# Altium PCB keyboard.PcbDoc
Units mm, origin at the board's own origin, x right, y up, seen from the top; angles counter-clockwise.
Board outline 142 x 101 mm, 2 copper layers (Top Layer, Bottom Layer), stack 1.18 mm thick; 94 components, 90 nets, 544 pads, 262 vias.
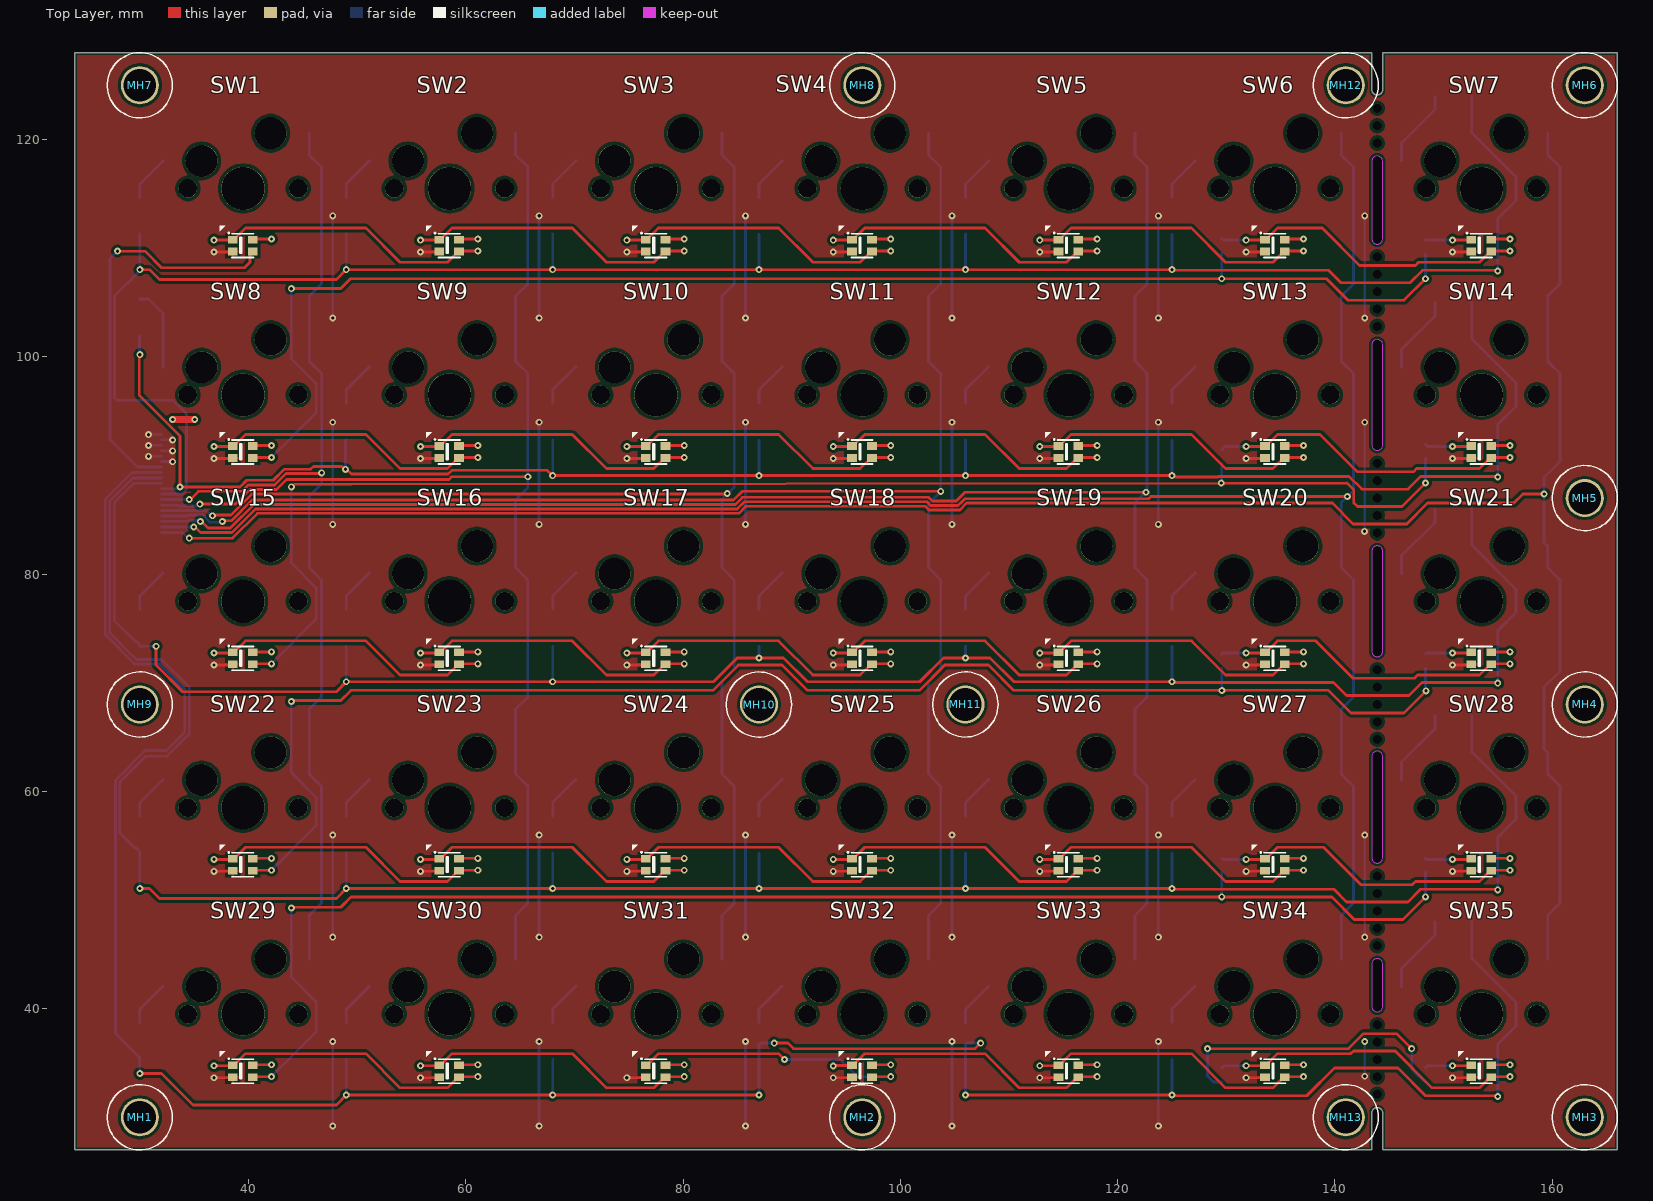
[diagram p0: Top Layer view]
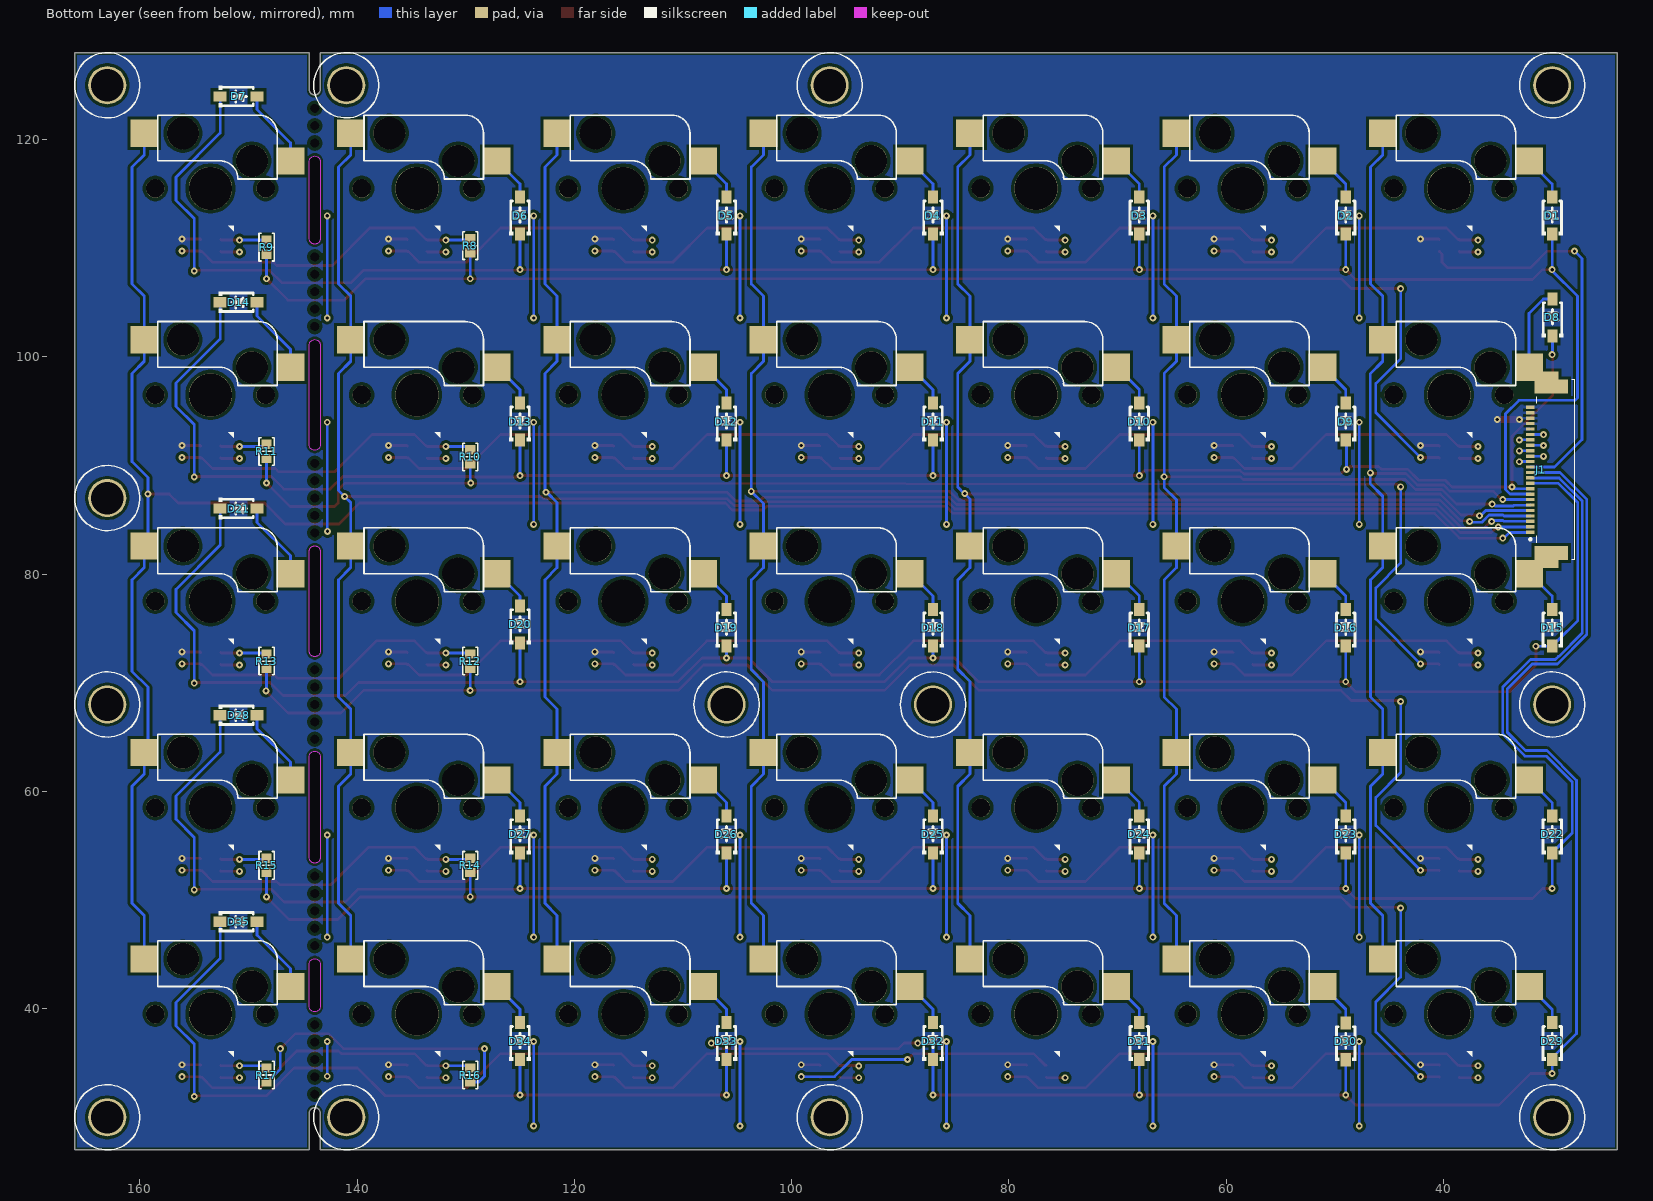
[diagram p1: Bottom Layer view, seen from below]
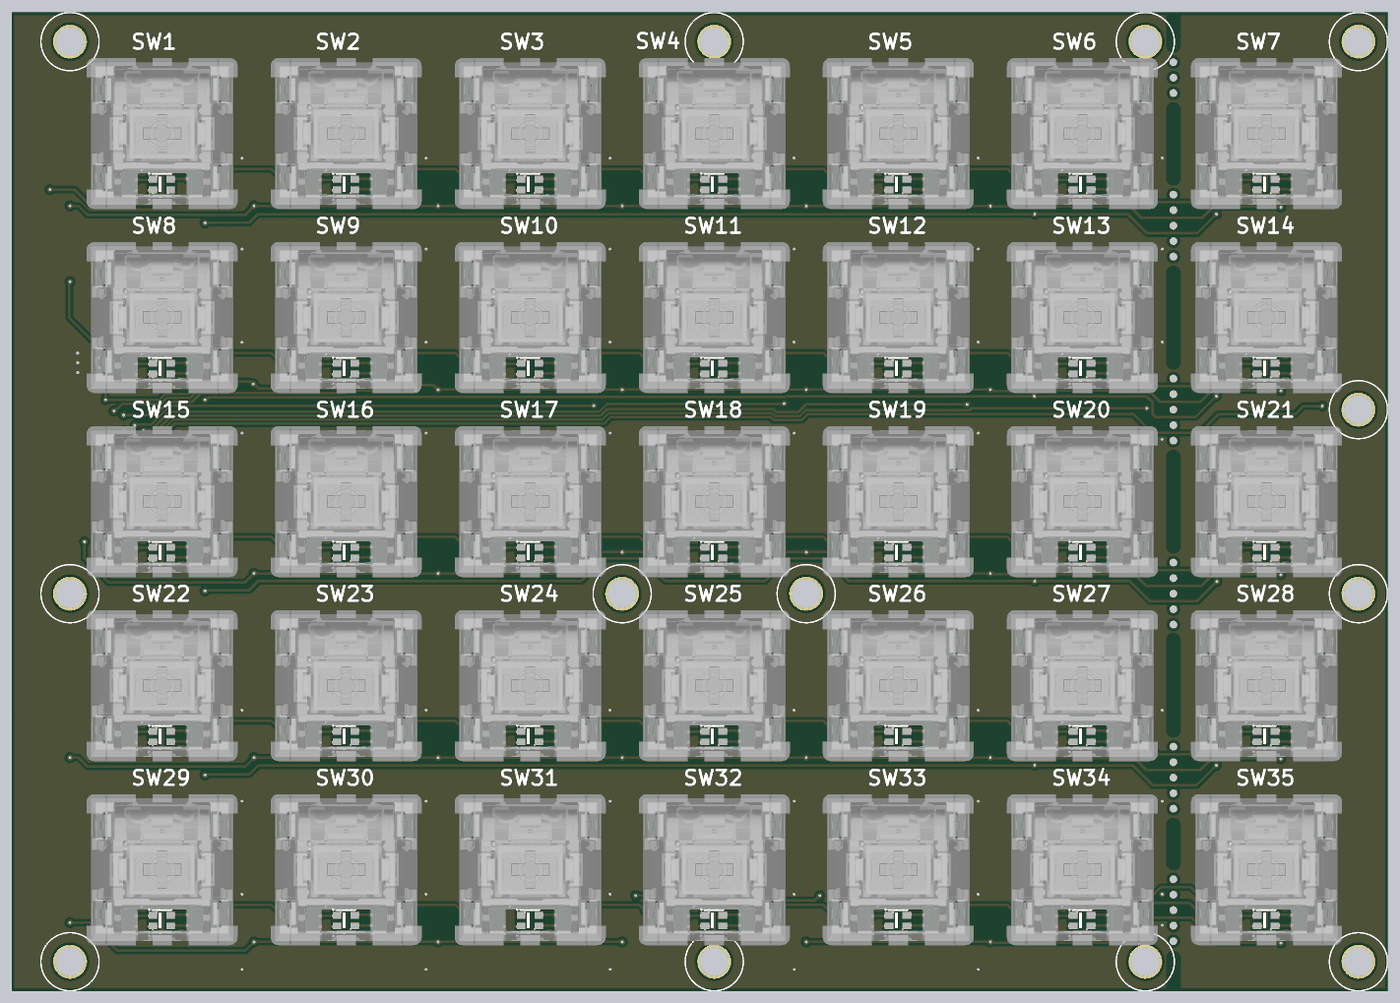
[diagram p2: 3D render of the assembled board from above, using the file's embedded part models]

## Layer stack, top to bottom
Top Solder: solder mask 0.01, Solder Resist, Dk 3.5
Top Layer: signal copper 0.035
Dielectric 1: dielectric 1.11, FR-4, Dk 4.8
Bottom Layer: signal copper 0.035
Bottom Solder: solder mask 0.01, Solder Resist, Dk 3.5

## Board outline
24,27 143.4,27 143.4,30.4 cw(c143.9,30.4) 144.4,30.4 144.4,27 166,27 166,128 144.4,128 144.4,124.6 cw(c143.9,124.6) 143.4,124.6 143.4,128 24,128
cut-out: 143.4,110.868 ccw(c143.891,110.868) 143.891,110.377 ccw(c143.891,110.886) 144.4,110.886 144.4,117.991 ccw(c143.9,117.991) 143.9,118.491 143.891,118.491 ccw(c143.891,118) 143.4,118
cut-out: 143.4,40.191 ccw(c143.891,40.191) 143.891,39.7 ccw(c143.891,40.209) 144.4,40.209 144.4,44.1 ccw(c143.9,44.1) 143.9,44.6 143.891,44.6 ccw(c143.891,44.109) 143.4,44.109
cut-out: 143.4,53.891 ccw(c143.891,53.891) 143.891,53.4 ccw(c143.891,53.909) 144.4,53.909 144.4,63.2 ccw(c143.9,63.2) 143.9,63.7 143.891,63.7 ccw(c143.891,63.209) 143.4,63.209 143.4,63.2
cut-out: 143.4,72.891 ccw(c143.891,72.891) 143.891,72.4 ccw(c143.891,72.909) 144.4,72.909 144.4,82.1 ccw(c143.9,82.1) 143.9,82.6 143.891,82.6 ccw(c143.891,82.109) 143.4,82.109 143.4,82.1
cut-out: 143.4,91.891 ccw(c143.891,91.891) 143.891,91.4 143.9,91.4 ccw(c143.9,91.9) 144.4,91.9 144.4,101.1 ccw(c143.9,101.1) 143.9,101.6 143.891,101.6 ccw(c143.891,101.109) 143.4,101.109

## Design rules (kind name [scope] priority, off if disabled: settings)
BoardOutlineClearance [All] p1: gap=0.254 ignorepadtopadclearanceinfootprint=FALSE except(0: Arc-SplitContinuation Track-SplitContinuation SMDPad-SplitContinuation THPad-SplitContinuation Via-SplitContinuation Fill-SplitContinuation Poly-SplitContinuation Region-SplitContinuation Text-SplitContinuation)
Clearance [All] p1: gap=0.254 ignorepadtopadclearanceinfootprint=FALSE except(0.152: Arc-Arc Arc-Track Arc-THPad Arc-Via Arc-Text Track-Track Track-THPad Track-Via Track-Text SMDPad-SMDPad SMDPad-THPad SMDPad-Via SMDPad-Text THPad-THPad THPad-Via THPad-Text Via-Via Via-Text Fill-Text Poly-Text Region-Text Text-Text; 0.203: Arc-SMDPad Track-SMDPad; 0.305: SMDPad-Hole THPad-Hole Via-Hole Fill-Hole Poly-Hole Region-Hole Text-Hole)
PolygonConnect [All] p1: thpad.connectstyle=Relief thpad.reliefconductorwidth=0.254 thpad.reliefentries=4 thpad.polygonreliefangle="90 Angle" thpad.airgapwidth=0.254 smdpad.connectstyle=Relief smdpad.reliefconductorwidth=0.254 smdpad.reliefentries=4 smdpad.polygonreliefangle="90 Angle" smdpad.airgapwidth=0.254 via.connectstyle=Direct via.reliefconductorwidth=0.254 via.reliefentries=4 via.polygonreliefangle="90 Angle" via.airgapwidth=0.254
RoomDefinition Designator [InComponentClass('Designator')] p1: confinementstyle=ConfineIn formatcopy=TRUE lockcomponents=FALSE outline 0,0 50.8,0 50.8,25.4 0,25.4
RoutingVias [All] p1: holewidth=0.305 width=0.635 viastyle="Through Hole" minholewidth=0.305 minwidth=0.635 maxholewidth=0.305 maxwidth=0.635
SolderMaskExpansion [All] p1: expansion=0.102 istentingtop=FALSE
Width [All] p1: maxlimit=1.016 minlimit=0.254 preferedwidth=0.254
30 further rules are at their usual default settings.

## Classes and differential pairs
component class keyboard_dual: J1

## Components (designator, comment, footprint, x,y, rotation, side; value= is the part's Value field where it differs from the comment)
D1 "1N4148" SOD-123 30,113 r90 bottom
D2 "1N4148" SOD-123 49,113 r90 bottom
D3 "1N4148" SOD-123 68,113 r90 bottom
D4 "1N4148" SOD-123 87,113 r90 bottom
D5 "1N4148" SOD-123 106,113 r90 bottom
D6 "1N4148" SOD-123 125,113 r90 bottom
D7 "1N4148" SOD-123 150.91,123.973 r180 bottom
D8 "1N4148" SOD-123 29.972,103.632 r90 bottom
D9 "1N4148" SOD-123 49,94.043 r90 bottom
D10 "1N4148" SOD-123 68,94.043 r90 bottom
D11 "1N4148" SOD-123 87,94.043 r90 bottom
D12 "1N4148" SOD-123 106,94.043 r90 bottom
D13 "1N4148" SOD-123 125,94.043 r90 bottom
D14 "1N4148" SOD-123 150.91,105.016 r180 bottom
D15 "1N4148" SOD-123 30,75.064 r90 bottom
D16 "1N4148" SOD-123 49,75.064 r90 bottom
D17 "1N4148" SOD-123 68,75.064 r90 bottom
D18 "1N4148" SOD-123 87,75.064 r90 bottom
D19 "1N4148" SOD-123 106,75.064 r90 bottom
D20 "1N4148" SOD-123 125,75.364 r90 bottom
D21 "1N4148" SOD-123 150.91,86.037 r180 bottom
D22 "1N4148" SOD-123 30,56.042 r90 bottom
D23 "1N4148" SOD-123 49,56.042 r90 bottom
D24 "1N4148" SOD-123 68,56.042 r90 bottom
D25 "1N4148" SOD-123 87,56.042 r90 bottom
D26 "1N4148" SOD-123 106,56.042 r90 bottom
D27 "1N4148" SOD-123 125,56.042 r90 bottom
D28 "1N4148" SOD-123 150.91,67.015 r180 bottom
D29 "1N4148" SOD-123 30,37.023 r90 bottom
D30 "1N4148" SOD-123 49,37 r90 bottom
D31 "1N4148" SOD-123 68,37.023 r90 bottom
D32 "1N4148" SOD-123 87,37.023 r90 bottom
D33 "1N4148" SOD-123 106,37.023 r90 bottom
D34 "1N4148" SOD-123 125,37.023 r90 bottom
D35 "1N4148" SOD-123 150.91,47.996 r180 bottom
J1 "52437-2471" 524372471 28.854,89.61 r90 bottom
MH1 "MountingHole" Hole_3mm 30,30 r0 top
MH2 "MountingHole" Hole_3mm 96.502,30 r0 top
MH3 "MountingHole" Hole_3mm 163,30 r0 top
MH4 "MountingHole" Hole_3mm 163,68 r0 top
MH5 "MountingHole" Hole_3mm 163,87 r0 top
MH6 "MountingHole" Hole_3mm 163,125 r0 top
MH7 "MountingHole" Hole_3mm 30,125 r0 top
MH8 "MountingHole" Hole_3mm 96.498,125 r0 top
MH9 "MountingHole" Hole_3mm 30,68 r0 top
MH10 "MountingHole" Hole_3mm 86.995,67.996 r0 top
MH11 "MountingHole" Hole_3mm 105.994,68 r0 top
MH12 "MountingHole" Hole_3mm 141,125 r0 top
MH13 "MountingHole" Hole_3mm 141,30 r0 top
R8 "Value" "RES 0603_1608" 129.591,110.236 r270 bottom
R9 "Value" "RES 0603_1608" 148.336,110.094 r270 bottom
R10 "Value" "RES 0603_1608" 129.591,90.79 r270 bottom
R11 "Value" "RES 0603_1608" 148.336,91.298 r270 bottom
R12 "Value" "RES 0603_1608" 129.591,71.994 r270 bottom
R13 "Value" "RES 0603_1608" 148.336,71.994 r270 bottom
R14 "Value" "RES 0603_1608" 129.591,53.198 r270 bottom
R15 "Value" "RES 0603_1608" 148.336,53.198 r270 bottom
R16 "Value" "RES 0603_1608" 129.591,33.894 r270 bottom
R17 "Value" "RES 0603_1608" 148.336,33.894 r270 bottom
SW1 "Kailh" KAILH_MX_SOCKET_WS2812 39.5,115.5 r0 top
SW2 "Kailh" KAILH_MX_SOCKET_WS2812 58.5,115.5 r0 top
SW3 "Kailh" KAILH_MX_SOCKET_WS2812 77.5,115.5 r0 top
SW4 "Kailh" KAILH_MX_SOCKET_WS2812 96.5,115.5 r0 top
SW5 "Kailh" KAILH_MX_SOCKET_WS2812 115.5,115.5 r0 top
SW6 "Kailh" KAILH_MX_SOCKET_WS2812 134.5,115.5 r0 top
SW7 "Kailh" KAILH_MX_SOCKET_WS2812 153.5,115.5 r0 top
SW8 "Kailh" KAILH_MX_SOCKET_WS2812 39.5,96.5 r0 top
SW9 "Kailh" KAILH_MX_SOCKET_WS2812 58.5,96.5 r0 top
SW10 "Kailh" KAILH_MX_SOCKET_WS2812 77.5,96.5 r0 top
SW11 "Kailh" KAILH_MX_SOCKET_WS2812 96.5,96.5 r0 top
SW12 "Kailh" KAILH_MX_SOCKET_WS2812 115.5,96.5 r0 top
SW13 "Kailh" KAILH_MX_SOCKET_WS2812 134.5,96.5 r0 top
SW14 "Kailh" KAILH_MX_SOCKET_WS2812 153.5,96.5 r0 top
SW15 "Kailh" KAILH_MX_SOCKET_WS2812 39.5,77.5 r0 top
SW16 "Kailh" KAILH_MX_SOCKET_WS2812 58.5,77.5 r0 top
SW17 "Kailh" KAILH_MX_SOCKET_WS2812 77.5,77.5 r0 top
SW18 "Kailh" KAILH_MX_SOCKET_WS2812 96.5,77.5 r0 top
SW19 "Kailh" KAILH_MX_SOCKET_WS2812 115.5,77.5 r0 top
SW20 "Kailh" KAILH_MX_SOCKET_WS2812 134.5,77.5 r0 top
SW21 "Kailh" KAILH_MX_SOCKET_WS2812 153.5,77.5 r0 top
SW22 "Kailh" KAILH_MX_SOCKET_WS2812 39.5,58.5 r0 top
SW23 "Kailh" KAILH_MX_SOCKET_WS2812 58.5,58.5 r0 top
SW24 "Kailh" KAILH_MX_SOCKET_WS2812 77.5,58.5 r0 top
SW25 "Kailh" KAILH_MX_SOCKET_WS2812 96.5,58.5 r0 top
SW26 "Kailh" KAILH_MX_SOCKET_WS2812 115.5,58.5 r0 top
SW27 "Kailh" KAILH_MX_SOCKET_WS2812 134.5,58.5 r0 top
SW28 "Kailh" KAILH_MX_SOCKET_WS2812 153.5,58.5 r0 top
SW29 "Kailh" KAILH_MX_SOCKET_WS2812 39.5,39.5 r0 top
SW30 "Kailh" KAILH_MX_SOCKET_WS2812 58.5,39.5 r0 top
SW31 "Kailh" KAILH_MX_SOCKET_WS2812 77.5,39.5 r0 top
SW32 "Kailh" KAILH_MX_SOCKET_WS2812 96.5,39.5 r0 top
SW33 "Kailh" KAILH_MX_SOCKET_WS2812 115.5,39.5 r0 top
SW34 "Kailh" KAILH_MX_SOCKET_WS2812 134.5,39.5 r0 top
SW35 "Kailh" KAILH_MX_SOCKET_WS2812 153.5,39.5 r0 top

## Footprints (in the part's own frame and the unit in brackets; to place one, negate y for a bottom-side part, rotate by r counter-clockwise, add the part's x,y. Pads: shape width x height; smd on the part's side, far side on the other; paste and mask are expansions set on the pad)
524372471 [mm]
  rect 0.3x0.8 smd: 1(-5.75,3.15) 2(-5.25,3.15) 3(-4.75,3.15) 4(-4.25,3.15) 5(-3.75,3.15) 6(-3.25,3.15) 7(-2.75,3.15) 8(-2.25,3.15) 9(-1.75,3.15) 10(-1.25,3.15) 11(-0.75,3.15) 12(-0.25,3.15) 13(0.25,3.15) 14(0.75,3.15) 15(1.25,3.15) 16(1.75,3.15) 17(2.25,3.15) 18(2.75,3.15) 19(3.25,3.15) 20(3.75,3.15) 21(4.25,3.15) 22(4.75,3.15) 23(5.25,3.15) 24(5.75,3.15)
  rect 1.1x2.2 smd: AMP1(-8.509,1.65) AMP2(8.509,1.651)
  rect 1.3x3.05 smd: MP1(-7.65,1.225) MP2(7.65,1.225)
  silkscreen extent -8.3,-0.95 8.3,3.25, body extent -9.3,-1.9 9.3,3.3, height 2.04
Hole_3mm [mm]
  round 3.5 hole 3: 0(0,0)
  body extent -0.5,-0.5 0.5,0.5, height 0.5
KAILH_MX_SOCKET_WS2812 [mm]
  rect 0.9x0.7 smd paste+0 mask+0.051: 1(-0.942,-4.707) 2(-0.942,-5.807) 3(0.888,-5.807) 4(0.888,-4.707)
  rect 2.55x2.5 smd far side paste+0 mask+0.102: S1(-7.36,2.54) S2(6.09,5.08)
  round 1.7 hole 1.7 unplated paste-2539.97: ""(-5.08,0) ""(5.08,0)
  round 2.95 hole 2.95 unplated paste-2539.97: ""(-3.81,2.54) ""(2.54,5.08)
  round 3.98 hole 3.98 unplated paste-2539.97: ""(0,0)
  silkscreen extent -2.16,-6.36 0.97,-3.43, body extent -7.9,-7.79 7.81,7.81, height 15.49
"RES 0603_1608" [mm] "Chip Resistor, 2-Leads, Body 1.60x0.80mm, IPC Medium Density"
  rect 0.85x0.95 smd: 1(-0.65,0) 2(0.65,0)
  silkscreen extent -1.27,-0.7 1.27,0.7, body extent -0.8,-0.4 0.8,0.4, height 0.45
SOD-123 [mm]
  rect 1.2x0.95 smd: 1(-1.7,0) 2(1.7,0)
  silkscreen extent -1.81,-0.98 1.35,0.98

## Part data
J1: "Connector", Manufacturer_Name=Molex, Mouser Part Number=538-52437-2471, Datasheet Link=https://componentsearchengine.com/Datasheets/2/52437-2471.pdf, Height=2mm, Manufacturer_Part_Number=52437-2471, Mouser Price/Stock=https://www.mouser.co.uk/ProductDetail/Molex/52437-2471?qs=nDwhpid8gJZdpyQIeZfjsA%3D%3D
R8 R9 R10 R11 R12 R13 R14 R15 R16 R17: library part RCA06030000ZSEA, "RES SMD 0 OHM JUMPER 1/10W 0603", Device Package="0603 (1608 Metric)", Manufacturer="Vishay Dale", Operating Temperature="-55°C ~ 155°C", Power (Watts)="0.1W, 1/10W", Ratings=AEC-Q200, Supplier Device Package=0603, Supplier Part Number 1=541-2192-1-ND, Tolerance=Jumper, ComponentLink1Description=Datasheet, ComponentLink1URL=http://www.vishay.com/docs/20037/rcae3.pdf, ComponentLink2Description="DigiKey Link", ComponentLink2URL=http://digikey.com/product-detail/en/vishay-dale/RCA06030000ZSEA/541-2192-1-ND/4946845, Composition="Thick Film", Features="Anti-Sulfur, Automotive AEC-Q200", Height - Seated (Max)="0.020\" (0.50mm)", LastUpdated="9/2/2020 1:10:23 AM", Lifecycle Status=Active, Minimum Order=1, Number of Terminations=2, Package / Case="0603 (1608 Metric)", Packaging=TapeAndReel, Part Number=RCA06030000ZSEA, Part Status=Active, PartId=5740, Price=0.01, Series=RCA, Size / Dimension="0.061\" L x 0.033\" W (1.55mm x 0.85mm)", Supplier 1=DigiKey
SW1 SW2 SW3 SW4 SW5 SW6 SW7 SW8 SW9 SW10 SW11 SW12 SW13 SW14 SW15 SW16 SW17 SW18 SW19 SW20 SW21 SW22 SW23 SW24 SW25 SW26 SW27 SW28 SW29 SW30 SW31 SW32 SW33 SW34 SW35: library part Kailh_hotswap_RGB_WS2812, "Kailh keyboard switch, hotswap rgb ws2812 in 2020 package, dual-side hotswap options + low prifile variant"

## Free pads (board coordinates)
  round 0 hole 0.8: 7(143.9,32.123) 7(143.9,33.723) 7(143.9,35.323) 7(143.9,36.923) 7(143.9,38.523) 7(143.9,45.8) 7(143.9,47.4) 7(143.9,49) 7(143.9,50.6) 7(143.9,52.2) 7(143.9,64.8) 7(143.9,66.4) 7(143.9,68) 7(143.9,69.6) 7(143.9,71.2) 7(143.9,83.8) 7(143.9,85.4) 7(143.9,87) 7(143.9,88.6) 7(143.9,90.2) 7(143.9,102.8) 7(143.9,104.4) 7(143.9,106) 7(143.9,107.6) 7(143.9,109.2) 7(143.9,119.677) 7(143.9,121.277) 7(143.9,122.877)

## Via types
v1: diameter 0.635, hole 0.305, Top Layer to Bottom Layer, tented both sides, 262 vias

## Nets (pads, with @x,y where several pads share a name; then routed paths per layer and width w, separated by ;. In a path a pad name is that pad's centre, name@x,y a point inside that pad or via, vN(x,y) a via of type N, cw(c..) or ccw(c..) an arc to the next point about the centre after c; other vN are vias at no path point)
+5: J1.20 J1.21 J1.22 J1.23 J1.24 SW1.4 SW2.4 SW3.4 SW4.4 SW5.4 SW6.4 SW7.4 SW8.4 SW9.4 SW10.4 SW11.4 SW12.4 SW13.4 SW14.4 SW15.4 SW16.4 SW17.4 SW18.4 SW19.4 SW20.4 SW21.4 SW22.4 SW23.4 SW24.4 SW25.4 SW26.4 SW27.4 SW28.4 SW29.4 SW30.4 SW31.4 SW32.4 SW33.4 SW34.4 SW35.4 | length 63.2
  Top Layer w0.254: SW29.4 40.437,34.842 v1(42.116,34.842) ; SW22.4 40.437,53.842 v1(42.116,53.842) ; SW15.4 40.437,72.842 v1(42.116,72.842) ; SW8.4 40.437,91.842 v1(42.116,91.842) ; SW1.4 40.437,110.842 v1(42.116,110.842) ; SW30.4 59.437,34.842 v1(61.116,34.842) ; SW23.4 59.437,53.842 v1(61.116,53.842) ; SW16.4 59.437,72.842 v1(61.116,72.842) ; SW9.4 59.437,91.842 v1(61.116,91.842) ; SW2.4 59.437,110.842 v1(61.116,110.842) ; SW31.4 78.437,34.842 v1(80.116,34.842) ; SW24.4 78.437,53.842 v1(80.116,53.842) ; SW17.4 78.437,72.842 v1(80.116,72.842) ; SW10.4 78.437,91.842 v1(80.116,91.842) ; SW3.4 78.437,110.842 v1(80.116,110.842) ; SW32.4 97.437,34.842 v1(99.116,34.842) ; SW25.4 97.437,53.842 v1(99.116,53.842) ; SW18.4 97.437,72.842 v1(99.116,72.842) ; SW11.4 97.437,91.842 v1(99.116,91.842) ; SW4.4 97.437,110.842 v1(99.116,110.842) ; SW33.4 116.437,34.842 v1(118.116,34.842) ; SW26.4 116.437,53.842 v1(118.116,53.842) ; SW19.4 116.437,72.842 v1(118.116,72.842) ; SW12.4 116.437,91.842 v1(118.116,91.842) ; SW5.4 116.437,110.842 v1(118.116,110.842) ; SW34.4 135.437,34.842 v1(137.116,34.842) ; SW27.4 135.437,53.842 v1(137.116,53.842) ; SW20.4 135.437,72.842 v1(137.116,72.842) ; SW13.4 135.437,91.842 v1(137.116,91.842) ; SW6.4 135.437,110.842 v1(137.116,110.842) ; SW35.4 154.437,34.842 v1(156.116,34.842) ; SW28.4 154.437,53.842 v1(156.116,53.842) ; SW21.4 154.437,72.842 v1(156.116,72.842) ; SW14.4 154.437,91.842 v1(156.116,91.842) ; SW7.4 154.437,110.842 v1(156.116,110.842)
  Top Layer w0.635: v1(33.02,94.234) v1(35.052,94.234)
col1: J1.1 SW7.S2 SW14.S2 SW21.S2 SW28.S2 SW35.S2 | length 211.3
  Top Layer w0.254: v1(34.544,83.312) 38.541,83.312 40.827,85.598 85.152,85.598 85.812,86.258 102.276,86.258 102.623,85.911 105.485,85.911 106.109,86.536 139.764,86.536 141.681,84.619 146.619,84.619 148.536,86.536 156.464,86.536 157.304,87.376 v1(159.258,87.376)
  Bottom Layer w0.254: J1.1 32.027,83.837 33.916,83.837 34.441,83.312 v1(34.544,83.312) ; v1@159.258,87.369 159.258,82.912 SW21.S2 159.59,80.596 160.711,79.475 160.711,71.049 159.258,69.596 159.258,63.912 SW28.S2 159.59,61.596 160.711,60.475 160.711,49.705 159.59,48.585 SW35.S2 ; v1(159.258,87.376) 159.258,88.9 160.711,90.353 160.711,98.475 159.59,99.596 SW14.S2 159.59,105.585 160.711,106.705 160.711,117.475 159.59,118.596 SW7.S2
col2: J1.2 SW6.S2 SW13.S2 SW20.S2 SW27.S2 SW34.S2 | length 190.7
  Top Layer w0.254: v1(34.965,84.339) 35.068,84.339 35.574,83.833 38.487,83.833 40.659,86.004 84.984,86.004 85.644,86.665 102.445,86.665 102.494,86.616 102.792,86.318 105.316,86.318 105.614,86.616 105.941,86.942 122.856,86.942 123.059,87.145 v1(141.15,87.145)
  Bottom Layer w0.254: J1.2 32.014,84.35 34.954,84.35 v1(34.965,84.339) ; SW34.S2 140.59,48.585 141.711,49.705 141.711,60.475 140.59,61.596 SW27.S2 140.59,67.585 141.711,68.705 141.711,79.475 140.59,80.596 140.59,86.585 v1(141.15,87.145) 141.711,87.705 141.711,98.475 140.59,99.596 SW13.S2 140.59,105.585 141.711,106.705 141.711,117.475 140.59,118.596 SW6.S2
col3: J1.3 SW5.S2 SW12.S2 SW19.S2 SW26.S2 SW33.S2 | length 172.1
  Top Layer w0.254: v1(35.569,84.844) 35.672,84.844 36.277,84.239 38.319,84.239 40.491,86.411 84.815,86.411 85.476,87.071 102.613,87.071 102.96,86.724 105.148,86.724 105.963,87.539 v1(122.609,87.539)
  Bottom Layer w0.254: J1.3 34.444,84.86 34.519,84.936 35.374,84.936 35.466,84.844 v1(35.569,84.844) ; SW33.S2 121.59,48.585 122.711,49.705 122.711,60.475 121.59,61.596 SW26.S2 121.59,67.585 122.711,68.705 122.711,79.475 121.59,80.596 SW19.S2 121.59,86.585 122.545,87.539 v1(122.609,87.539) ; SW5.S2 121.59,118.596 122.711,117.475 122.711,106.705 121.59,105.585 SW12.S2 121.59,99.596 122.711,98.475 v1@122.711,87.705
col4: J1.4 SW4.S2 SW11.S2 SW18.S2 SW25.S2 SW32.S2 | length 152.9
  Top Layer w0.254: v1(37.592,84.836) 37.665,84.909 38.414,84.909 40.322,86.817 84.647,86.817 85.449,87.619 v1(103.725,87.619)
  Bottom Layer w0.254: J1.4 34.444,85.36 34.524,85.441 35.817,85.441 36.166,85.091 36.166,85.057 36.443,84.78 37.536,84.78 v1(37.592,84.836) ; SW32.S2 102.59,48.585 103.711,49.705 103.711,60.475 102.59,61.596 SW25.S2 102.59,70.078 103.711,71.199 103.711,79.475 102.59,80.596 102.59,86.485 v1(103.725,87.619) 103.711,87.633 103.711,98.475 102.59,99.596 SW11.S2 102.59,105.585 103.711,106.705 103.711,117.475 102.59,118.596 SW4.S2
col5: J1.5 SW3.S2 SW10.S2 SW17.S2 SW24.S2 SW31.S2 | length 132.9
  Top Layer w0.254: v1(36.69,85.377) 36.763,85.45 38.38,85.45 40.311,87.38 84.04,87.38 v1(84.074,87.414)
  Bottom Layer w0.254: J1.5 32.017,85.847 36.117,85.847 36.587,85.377 v1(36.69,85.377) ; SW31.S2 83.59,48.585 84.711,49.705 84.711,60.475 83.59,61.596 SW24.S2 83.59,70.128 84.711,71.249 84.711,79.475 83.59,80.596 SW17.S2 83.59,86.92 84.074,87.404 v1(84.074,87.414) ; SW3.S2 83.59,118.596 84.711,117.475 84.711,106.705 83.59,105.585 SW10.S2 83.59,99.596 84.711,98.475 84.711,88.013 v1@84.074,87.376
col6: J1.6 SW2.S2 SW9.S2 SW16.S2 SW23.S2 SW30.S2 | length 114.6
  Top Layer w0.254: v1(35.528,86.444) 38.8,86.444 40.145,87.79 42.578,87.79 43.51,88.722 58.467,88.722 58.705,88.96 v1(65.716,88.96)
  Bottom Layer w0.254: J1.6 32.024,86.34 33.5,86.34 33.569,86.271 35.252,86.271 35.424,86.444 v1(35.528,86.444) ; SW30.S2 64.59,48.585 65.711,49.705 65.711,60.475 64.59,61.596 SW23.S2 64.59,67.585 65.711,68.705 65.711,79.475 64.59,80.596 SW16.S2 64.59,86.847 65.716,87.973 65.716,98.47 64.59,99.596 SW9.S2 64.59,105.585 65.711,106.705 65.711,117.475 64.59,118.596 SW2.S2
col7: J1.7 SW1.S2 SW8.S2 SW15.S2 SW22.S2 SW29.S2 | length 95.6
  Top Layer w0.254: v1(34.544,86.868) 34.647,86.868 35.398,87.619 39.4,87.619 39.977,88.196 42.409,88.196 43.469,89.256 46.672,89.256 v1(46.736,89.319)
  Bottom Layer w0.254: J1.7 34.536,86.86 v1(34.544,86.868) ; SW29.S2 45.59,48.585 46.711,49.705 46.711,60.475 45.59,61.596 SW22.S2 45.59,67.585 46.711,68.705 46.711,79.475 45.59,80.596 SW15.S2 45.59,87.165 46.754,88.328 v1@46.754,89.39 ; SW1.S2 45.59,118.596 46.711,117.475 46.711,106.705 45.59,105.585 SW8.S2 45.59,99.596 46.754,98.432 46.754,89.337 v1(46.736,89.319)
GND: J1.14 J1.15 J1.16 J1.17 J1.18 J1.19 SW1.2 SW2.2 SW3.2 SW4.2 SW5.2 SW6.2 SW7.2 SW8.2 SW9.2 SW10.2 SW11.2 SW12.2 SW13.2 SW14.2 SW15.2 SW16.2 SW17.2 SW18.2 SW19.2 SW20.2 SW21.2 SW22.2 SW23.2 SW24.2 SW25.2 SW26.2 SW27.2 SW28.2 SW29.2 SW30.2 SW31.2 SW32.2 SW33.2 SW34.2 SW35.2 | length 279.8
  Top Layer w0.254: v1(36.83,33.644) 38.509,33.644 SW29.2 ; v1(36.83,52.644) 38.509,52.644 SW22.2 ; v1(36.83,71.644) 38.509,71.644 SW15.2 ; v1(36.83,90.644) 38.509,90.644 SW8.2 ; v1(36.83,109.644) 38.509,109.644 SW1.2 ; v1(55.83,33.644) 57.509,33.644 SW30.2 ; v1(55.83,52.644) 57.509,52.644 SW23.2 ; v1(55.83,71.644) 57.509,71.644 SW16.2 ; v1(55.83,90.644) 57.509,90.644 SW9.2 ; v1(55.83,109.644) 57.509,109.644 SW2.2 ; v1(74.83,33.644) 76.509,33.644 SW31.2 ; v1(74.83,52.644) 76.509,52.644 SW24.2 ; v1(74.83,71.644) 76.509,71.644 SW17.2 ; v1(74.83,90.644) 76.509,90.644 SW10.2 ; v1(74.83,109.644) 76.509,109.644 SW3.2 ; v1(93.83,33.644) 95.509,33.644 SW32.2 ; v1(93.83,52.644) 95.509,52.644 SW25.2 ; v1(93.83,71.644) 95.509,71.644 SW18.2 ; v1(93.83,90.644) 95.509,90.644 SW11.2 ; v1(93.83,109.644) 95.509,109.644 SW4.2 ; v1(112.83,33.644) 114.509,33.644 SW33.2 ; v1(112.83,52.644) 114.509,52.644 SW26.2 ; v1(112.83,71.644) 114.509,71.644 SW19.2 ; v1(112.83,90.644) 114.509,90.644 SW12.2 ; v1(112.83,109.644) 114.509,109.644 SW5.2 ; v1(131.83,33.644) 133.509,33.644 SW34.2 ; v1(131.83,52.644) 133.509,52.644 SW27.2 ; v1(131.83,71.644) 133.509,71.644 SW20.2 ; v1(131.83,90.644) 133.509,90.644 SW13.2 ; v1(131.83,109.644) 133.509,109.644 SW6.2 ; v1(150.83,33.644) 152.509,33.644 SW35.2 ; v1(150.83,52.644) 152.509,52.644 SW28.2 ; v1(150.83,71.644) 152.509,71.644 SW21.2 ; v1(150.83,90.644) 152.509,90.644 SW14.2 ; v1(150.83,109.644) 152.509,109.644 SW7.2
  Bottom Layer w0.254: v1(30.795,90.843) 30.812,90.86 J1.15 ; v1(30.795,91.843) 30.812,91.86 J1.17 ; v1(30.795,92.843) 30.812,92.86 J1.19 ; J1.14 33.003,90.36 v1(33.02,90.343) ; J1.16 33.003,91.36 v1(33.02,91.343) ; J1.18 33.003,92.36 v1(33.02,92.343) ; v1(47.752,29.21) v1(47.752,36.98) ; v1(47.752,46.582) v1(47.752,55.98) ; v1(47.752,84.582) v1(47.752,93.98) ; v1(47.752,103.582) v1(47.752,112.98) ; v1(66.752,29.21) v1(66.752,36.98) ; v1(66.752,46.582) v1(66.752,55.98) ; v1(66.752,84.582) v1(66.752,93.98) ; v1(66.752,103.582) v1(66.752,112.98) ; v1(85.752,29.21) v1(85.752,36.98) ; v1(85.752,46.582) v1(85.752,55.98) ; v1(85.752,84.582) v1(85.752,93.98) ; v1(85.752,103.582) v1(85.752,112.98) ; v1(104.752,29.21) v1(104.752,36.98) ; v1(104.752,46.582) v1(104.752,55.98) ; v1(104.752,84.582) v1(104.752,93.98) ; v1(104.752,103.582) v1(104.752,112.98) ; v1(123.752,29.21) v1(123.752,36.98) ; v1(123.752,46.582) v1(123.752,55.98) ; v1(123.752,84.582) v1(123.752,93.98) ; v1(123.752,103.582) v1(123.752,112.98) ; v1(142.725,83.937) 142.752,83.964 v1(142.752,93.98) ; v1(142.748,33.782) 142.752,33.786 v1(142.752,36.98) ; v1(142.752,46.582) v1(142.752,55.98) ; v1(142.752,103.582) v1(142.752,112.98)
led_in: J1.13 SW1.3 | length 37.6
  Top Layer w0.254: v1(27.94,109.728) 30.48,109.728 32.004,108.204 39.624,108.204 40.132,108.712 40.132,109.47 40.355,109.693 SW1.3
  Bottom Layer w0.254: v1(27.94,109.728) 27.26,109.048 27.26,92.374 29.774,89.86 J1.13
led_out: R16.2 R17.2 | length 27.7
  Top Layer w0.254: v1(128.27,36.322) 141.25,36.322 142.632,37.704 145.684,37.704 v1(147.066,36.322)
  Bottom Layer w0.254: v1(128.27,36.322) 128.27,33.782 128.808,33.244 R16.2 ; v1(147.066,36.322) 147.066,34.447 147.724,33.789 147.791,33.789 147.988,33.592 147.988,33.542 148.286,33.244 R17.2
NetD1_2: D1.2 SW1.S1 | length 4.2
  Bottom Layer w0.254: D1.2 30,115.925 32.115,118.04 SW1.S1
NetD2_2: D2.2 SW2.S1 | length 4.2
  Bottom Layer w0.254: D2.2 49,115.925 51.115,118.04 SW2.S1
NetD3_2: D3.2 SW3.S1 | length 4.2
  Bottom Layer w0.254: D3.2 68,115.925 70.115,118.04 SW3.S1
NetD4_2: D4.2 SW4.S1 | length 4.2
  Bottom Layer w0.254: D4.2 87,115.925 89.115,118.04 SW4.S1
NetD5_2: D5.2 SW5.S1 | length 4.2
  Bottom Layer w0.254: D5.2 106,115.925 108.115,118.04 SW5.S1
NetD6_2: D6.2 SW6.S1 | length 4.2
  Bottom Layer w0.254: D6.2 125,115.925 127.115,118.04 SW6.S1
NetD7_2: D7.2 SW7.S1 | length 7.2
  Bottom Layer w0.254: SW7.S1 146.14,119.699 149.21,122.768 D7.2
NetD8_2: D8.2 SW8.S1 | length 7.7
  Bottom Layer w0.254: D8.2 30.812,105.332 32.14,104.004 SW8.S1
NetD9_2: D9.2 SW9.S1 | length 4.2
  Bottom Layer w0.254: D9.2 49,96.968 51.115,99.083 SW9.S1@51.14,99.083
NetD10_2: D10.2 SW10.S1 | length 4.2
  Bottom Layer w0.254: D10.2 68,96.968 70.115,99.083 SW10.S1@70.14,99.083
NetD11_2: D11.2 SW11.S1 | length 4.2
  Bottom Layer w0.254: D11.2 87,96.968 89.115,99.083 SW11.S1@89.14,99.083
NetD12_2: D12.2 SW12.S1 | length 4.2
  Bottom Layer w0.254: D12.2 106,96.968 108.115,99.083 SW12.S1@108.14,99.083
NetD13_2: D13.2 SW13.S1 | length 4.2
  Bottom Layer w0.254: D13.2 125,96.968 127.115,99.083 SW13.S1@127.14,99.083
NetD14_2: D14.2 SW14.S1 | length 7.2
  Bottom Layer w0.254: SW14.S1 146.14,100.699 149.21,103.768 D14.2@149.21,104.973
NetD15_2: D15.2 SW15.S1 | length 4.2
  Bottom Layer w0.254: D15.2 30,77.989 32.115,80.104 SW15.S1@32.14,80.104
NetD16_2: D16.2 SW16.S1 | length 4.2
  Bottom Layer w0.254: D16.2 49,77.989 51.115,80.104 SW16.S1@51.14,80.104
NetD17_2: D17.2 SW17.S1 | length 4.2
  Bottom Layer w0.254: D17.2 68,77.989 70.115,80.104 SW17.S1@70.14,80.104
NetD18_2: D18.2 SW18.S1 | length 4.2
  Bottom Layer w0.254: D18.2 87,77.989 89.115,80.104 SW18.S1@89.14,80.104
NetD19_2: D19.2 SW19.S1 | length 4.2
  Bottom Layer w0.254: D19.2 106,77.989 108.115,80.104 SW19.S1@108.14,80.104
NetD20_2: D20.2 SW20.S1 | length 4.2
  Bottom Layer w0.254: D20.2@125,76.764 125,77.989 127.115,80.104 SW20.S1@127.14,80.104
NetD21_2: D21.2 SW21.S1 | length 7.2
  Bottom Layer w0.254: SW21.S1 146.14,81.699 149.21,84.768 D21.2@149.21,85.973
NetD22_2: D22.2 SW22.S1 | length 4.2
  Bottom Layer w0.254: D22.2 30,58.967 32.115,61.082 SW22.S1@32.14,61.082
NetD23_2: D23.2 SW23.S1 | length 4.2
  Bottom Layer w0.254: D23.2 49,58.967 51.115,61.082 SW23.S1@51.14,61.082
NetD24_2: D24.2 SW24.S1 | length 4.2
  Bottom Layer w0.254: D24.2 68,58.967 70.115,61.082 SW24.S1@70.14,61.082
NetD25_2: D25.2 SW25.S1 | length 4.2
  Bottom Layer w0.254: D25.2 87,58.967 89.115,61.082 SW25.S1@89.14,61.082
NetD26_2: D26.2 SW26.S1 | length 4.2
  Bottom Layer w0.254: D26.2 106,58.967 108.115,61.082 SW26.S1@108.14,61.082
NetD27_2: D27.2 SW27.S1 | length 4.2
  Bottom Layer w0.254: D27.2 125,58.967 127.115,61.082 SW27.S1@127.14,61.082
NetD28_2: D28.2 SW28.S1 | length 7.2
  Bottom Layer w0.254: SW28.S1 146.14,62.699 149.21,65.768 D28.2@149.21,66.973
NetD29_2: D29.2 SW29.S1 | length 4.2
  Bottom Layer w0.254: D29.2 30,39.948 32.115,42.063 SW29.S1@32.14,42.063
NetD30_2: D30.2 SW30.S1 | length 4.2
  Bottom Layer w0.254: D30.2@49,38.723 49,39.948 51.115,42.063 SW30.S1@51.14,42.063
NetD31_2: D31.2 SW31.S1 | length 4.2
  Bottom Layer w0.254: D31.2 68,39.948 70.115,42.063 SW31.S1@70.14,42.063
NetD32_2: D32.2 SW32.S1 | length 4.2
  Bottom Layer w0.254: D32.2 87,39.948 89.115,42.063 SW32.S1@89.14,42.063
NetD33_2: D33.2 SW33.S1 | length 4.2
  Bottom Layer w0.254: D33.2 106,39.948 108.115,42.063 SW33.S1@108.14,42.063
NetD34_2: D34.2 SW34.S1 | length 4.2
  Bottom Layer w0.254: D34.2 125,39.948 127.115,42.063 SW34.S1@127.14,42.063
NetD35_2: D35.2 SW35.S1 | length 7.2
  Bottom Layer w0.254: SW35.S1 146.14,43.699 149.21,46.768 D35.2@149.21,47.973
NetR8_1: R8.1 SW6.1 SW7.3 | length 29
  Top Layer w0.254: v1(131.83,110.744) 133.509,110.744 SW6.1 133.658,110.793 134.727,111.862 138.838,111.862 142.281,108.419 147.419,108.419 147.712,108.712 153.307,108.712 154.288,109.693 SW7.3 154.437,109.742 v1(156.116,109.742)
  Bottom Layer w0.254: R8.1 129.733,110.744 v1(131.83,110.744)
NetR8_2: R8.2 R9.2 SW8.3 | length 131
  Top Layer w0.254: SW8.3 40.437,90.742 v1(42.116,90.742) ; v1@43.945,106.299 48.489,106.299 49.378,107.188 v1(129.591,107.188) 139.212,107.188 141.181,105.219 146.367,105.219 v1(148.336,107.188)
  Bottom Layer w0.254: v1(42.116,90.742) 46.228,94.854 46.228,97.536 43.947,99.817 43.947,102.37 43.945,102.372 v1(43.945,106.276) v1@43.945,106.287 ; v1(129.591,107.188) R8.2 ; v1(148.336,107.188) R9.2
NetR9_1: R9.1 SW7.1 | length 4.2
  Top Layer w0.254: v1(150.83,110.744) 152.509,110.744 SW7.1
  Bottom Layer w0.254: R9.1 v1(150.83,110.744)
NetR10_1: R10.1 SW13.1 SW14.3 | length 29.2
  Top Layer w0.254: v1(131.83,91.744) SW13.1@133.509,91.744 ; v1(156.116,90.742) 154.437,90.742 SW14.3 154.288,90.693 153.307,89.712 147.512,89.712 147.219,89.419 142.081,89.419 138.638,92.862 134.727,92.862 133.658,91.793 SW13.1 ; SW13.1@133.509,91.744 SW13.1 ; SW13.1@133.509,91.744 SW13.1 ; SW13.1@133.509,91.744 SW13.1
  Bottom Layer w0.254: R10.1 129.889,91.738 130.082,91.738 130.088,91.744 v1(131.83,91.744)
NetR10_2: R10.2 R11.2 SW15.3 | length 131.7
  Top Layer w0.254: SW15.3 40.437,71.742 v1(42.116,71.742) ; v1(43.945,88.029) 44.031,88.029 44.284,88.282 49.428,88.282 129.54,88.371 141.116,88.384 141.747,87.753 141.747,86.553 142.081,86.219 146.163,86.219 v1(148.336,88.392)
  Bottom Layer w0.254: v1(42.116,71.742) 46.228,75.854 46.228,78.74 43.947,81.021 43.947,83.37 43.945,83.372 v1(43.945,88.029) ; v1(129.54,88.392) 129.591,88.443 R10.2 ; v1(148.336,88.392) R11.2
NetR11_1: R11.1 SW14.1 | length 4.3
  Top Layer w0.254: v1(150.83,91.744) 152.509,91.744 SW14.1
  Bottom Layer w0.254: R11.1 148.54,91.744 v1(150.83,91.744)
NetR12_1: R12.1 SW20.1 SW21.3 | length 29.1
  Top Layer w0.254: v1(131.83,72.744) 133.509,72.744 SW20.1 133.658,72.793 134.727,73.862 138.238,73.862 141.681,70.419 147.319,70.419 147.612,70.712 153.307,70.712 154.288,71.693 SW21.3 ; v1(156.116,71.742) SW21.3@154.437,71.742 ; SW21.3 SW21.3@154.437,71.742 ; SW21.3 SW21.3@154.437,71.742
  Bottom Layer w0.254: R12.1 129.691,72.744 v1(131.83,72.744)
NetR12_2: R12.2 R13.2 SW22.3 | length 134.5
  Top Layer w0.254: SW22.3 40.437,52.742 v1(42.116,52.742) ; v1@43.945,68.363 48.489,68.363 49.428,69.303 82.765,69.303 85.09,71.628 89.115,71.628 91.44,69.303 101.765,69.303 104.09,71.628 108.115,71.628 110.44,69.303 129.595,69.303 139.397,69.303 141.481,67.219 146.344,67.219 v1(148.386,69.261)
  Bottom Layer w0.254: v1(42.116,52.742) 46.228,56.854 46.228,59.436 43.947,61.717 43.947,64.37 43.945,64.372 v1(43.945,68.276) ; R12.2 129.591,69.291 v1(129.595,69.287) ; R13.2 148.336,69.311 v1(148.386,69.261)
NetR13_1: R13.1 SW21.1 | length 4.3
  Top Layer w0.254: v1(150.83,72.744) 152.509,72.744 SW21.1
  Bottom Layer w0.254: R13.1 148.436,72.744 v1(150.83,72.744)
NetR14_1: R14.1 SW27.1 SW28.3 | length 29
  Top Layer w0.254: v1(131.83,53.744) 133.509,53.744 SW27.1 133.658,53.793 134.727,54.862 138.938,54.862 142.381,51.419 147.119,51.419 147.412,51.712 153.307,51.712 154.288,52.693 SW28.3 154.437,52.742 v1(156.116,52.742)
  Bottom Layer w0.254: R14.1 129.695,53.744 v1(131.83,53.744)
NetR14_2: R14.2 R15.2 SW29.3 | length 130.9
  Top Layer w0.254: SW29.3 40.437,33.742 v1(42.116,33.742) ; v1@43.945,49.341 48.489,49.341 49.428,50.281 129.591,50.281 139.719,50.281 141.781,48.219 146.263,48.219 v1(148.336,50.292)
  Bottom Layer w0.254: v1(42.116,33.742) 46.228,37.854 46.228,40.64 43.947,42.921 43.947,45.37 43.945,45.372 v1(43.945,49.276) ; v1(129.591,50.292) R14.2 ; v1(148.336,50.292) R15.2
NetR15_1: R15.1 SW28.1 | length 4.3
  Top Layer w0.254: v1(150.83,53.744) 152.509,53.744 SW28.1
  Bottom Layer w0.254: R15.1 148.44,53.744 v1(150.83,53.744)
NetR16_1: R16.1 SW34.1 SW35.3 | length 29.1
  Top Layer w0.254: v1(131.83,34.744) SW34.1@133.509,34.744 ; v1(156.116,33.742) 154.437,33.742 SW35.3 154.288,33.693 153.307,32.712 148.95,32.712 145.558,36.104 141.704,36.104 141.462,35.862 134.727,35.862 133.658,34.793 SW34.1 ; SW34.1@133.509,34.744 SW34.1 ; SW34.1@133.509,34.744 SW34.1
  Bottom Layer w0.254: R16.1 129.791,34.744 v1(131.83,34.744)
NetR17_1: R17.1 SW35.1 | length 4.3
  Top Layer w0.254: v1(150.83,34.744) 152.509,34.744 SW35.1
  Bottom Layer w0.254: R17.1 148.536,34.744 v1(150.83,34.744)
NetSW1_1: SW1.1 SW2.3 | length 26.5
  Top Layer w0.254: v1(36.83,110.744) 38.509,110.744 SW1.1 38.658,110.793 39.727,111.862 50.8,111.862 53.95,108.712 58.307,108.712 59.288,109.693 SW2.3 59.437,109.742 v1(61.116,109.742)
NetSW2_1: SW2.1 SW3.3 | length 30
  Top Layer w0.254: SW2.1@57.509,110.744 v1(55.83,110.744) SW2.1@57.509,110.744 ; SW2.1@57.509,110.744 SW2.1 ; SW2.1@57.509,110.744 SW2.1 ; SW2.1 57.658,110.793 58.727,111.862 69.8,111.862 72.95,108.712 77.307,108.712 78.288,109.693 SW3.3 ; SW3.3 SW3.3@78.437,109.742 ; SW3.3 SW3.3@78.437,109.742 ; SW3.3@78.437,109.742 v1(80.116,109.742) SW3.3@78.437,109.742
NetSW3_1: SW3.1 SW4.3 | length 30
  Top Layer w0.254: SW3.1@76.509,110.744 v1(74.83,110.744) SW3.1@76.509,110.744 ; SW3.1@76.509,110.744 SW3.1 ; SW3.1@76.509,110.744 SW3.1 ; SW3.1 76.658,110.793 77.727,111.862 88.8,111.862 91.95,108.712 96.307,108.712 97.288,109.693 SW4.3 ; SW4.3 SW4.3@97.437,109.742 ; SW4.3 SW4.3@97.437,109.742 ; SW4.3@97.437,109.742 v1(99.116,109.742) SW4.3@97.437,109.742
NetSW4_1: SW4.1 SW5.3 | length 30
  Top Layer w0.254: SW4.1@95.509,110.744 v1(93.83,110.744) SW4.1@95.509,110.744 ; SW4.1@95.509,110.744 SW4.1 ; SW4.1@95.509,110.744 SW4.1 ; SW4.1 95.658,110.793 96.727,111.862 107.8,111.862 110.95,108.712 115.307,108.712 116.288,109.693 SW5.3 ; SW5.3 SW5.3@116.437,109.742 ; SW5.3 SW5.3@116.437,109.742 ; SW5.3@116.437,109.742 v1(118.116,109.742) SW5.3@116.437,109.742
NetSW5_1: SW5.1 SW6.3 | length 30
  Top Layer w0.254: SW5.1 114.509,110.744 v1(112.83,110.744) 114.509,110.744 SW5.1 ; SW5.1 114.658,110.793 115.727,111.862 126.8,111.862 129.95,108.712 134.307,108.712 135.288,109.693 SW6.3 ; SW6.3 SW6.3@135.437,109.742 ; SW6.3 SW6.3@135.437,109.742 ; SW6.3@135.437,109.742 v1(137.116,109.742) SW6.3@135.437,109.742
NetSW8_1: SW8.1 SW9.3 | length 30
  Top Layer w0.254: SW8.1@38.509,91.744 v1(36.83,91.744) SW8.1@38.509,91.744 ; SW8.1@38.509,91.744 SW8.1 ; SW8.1@38.509,91.744 SW8.1 ; SW8.1 38.658,91.793 39.727,92.862 50.8,92.862 53.95,89.712 58.307,89.712 59.288,90.693 SW9.3 ; SW9.3 SW9.3@59.437,90.742 ; SW9.3 SW9.3@59.437,90.742 ; SW9.3@59.437,90.742 v1(61.116,90.742) SW9.3@59.437,90.742
NetSW9_1: SW9.1 SW10.3 | length 33.5
  Top Layer w0.254: v1(55.83,91.744) SW9.1@57.509,91.744 ; v1(55.83,91.744) SW9.1@57.509,91.744 ; v1(55.83,91.744) SW9.1@57.509,91.744 ; SW9.1@57.509,91.744 SW9.1 ; SW9.1@57.509,91.744 SW9.1 ; SW9.1@57.509,91.744 SW9.1 ; SW9.1 57.658,91.793 58.727,92.862 69.8,92.862 72.95,89.712 77.307,89.712 78.288,90.693 SW10.3 ; SW10.3 SW10.3@78.437,90.742 ; SW10.3 SW10.3@78.437,90.742 ; SW10.3 SW10.3@78.437,90.742 ; SW10.3@78.437,90.742 v1(80.116,90.742) ; SW10.3@78.437,90.742 v1(80.116,90.742) ; SW10.3@78.437,90.742 v1(80.116,90.742)
NetSW10_1: SW10.1 SW11.3 | length 33.5
  Top Layer w0.254: v1(74.83,91.744) SW10.1@76.509,91.744 ; v1(74.83,91.744) SW10.1@76.509,91.744 ; v1(74.83,91.744) SW10.1@76.509,91.744 ; SW10.1@76.509,91.744 SW10.1 ; SW10.1@76.509,91.744 SW10.1 ; SW10.1@76.509,91.744 SW10.1 ; SW10.1 76.658,91.793 77.727,92.862 88.8,92.862 91.95,89.712 96.307,89.712 97.288,90.693 SW11.3 ; SW11.3 SW11.3@97.437,90.742 ; SW11.3 SW11.3@97.437,90.742 ; SW11.3 SW11.3@97.437,90.742 ; SW11.3@97.437,90.742 v1(99.116,90.742) ; SW11.3@97.437,90.742 v1(99.116,90.742) ; SW11.3@97.437,90.742 v1(99.116,90.742)
NetSW11_1: SW11.1 SW12.3 | length 33.5
  Top Layer w0.254: v1(93.83,91.744) SW11.1@95.509,91.744 ; v1(93.83,91.744) SW11.1@95.509,91.744 ; v1(93.83,91.744) SW11.1@95.509,91.744 ; SW11.1@95.509,91.744 SW11.1 ; SW11.1@95.509,91.744 SW11.1 ; SW11.1@95.509,91.744 SW11.1 ; SW11.1 95.658,91.793 96.727,92.862 107.8,92.862 110.95,89.712 115.307,89.712 116.288,90.693 SW12.3 ; SW12.3 SW12.3@116.437,90.742 ; SW12.3 SW12.3@116.437,90.742 ; SW12.3 SW12.3@116.437,90.742 ; SW12.3@116.437,90.742 v1(118.116,90.742) ; SW12.3@116.437,90.742 v1(118.116,90.742) ; SW12.3@116.437,90.742 v1(118.116,90.742)
NetSW12_1: SW12.1 SW13.3 | length 33.5
  Top Layer w0.254: v1(112.83,91.744) 114.509,91.744 SW12.1 ; v1(112.83,91.744) SW12.1@114.509,91.744 ; v1(112.83,91.744) SW12.1@114.509,91.744 ; SW12.1@114.509,91.744 SW12.1 ; SW12.1@114.509,91.744 SW12.1 ; SW12.1 114.658,91.793 115.727,92.862 126.8,92.862 129.95,89.712 134.307,89.712 135.288,90.693 SW13.3 ; SW13.3 SW13.3@135.437,90.742 ; SW13.3 SW13.3@135.437,90.742 ; SW13.3 SW13.3@135.437,90.742 ; SW13.3@135.437,90.742 v1(137.116,90.742) ; SW13.3@135.437,90.742 v1(137.116,90.742) ; SW13.3@135.437,90.742 v1(137.116,90.742)
NetSW15_1: SW15.1 SW16.3 | length 30
  Top Layer w0.254: SW15.1@38.509,72.744 v1(36.83,72.744) SW15.1@38.509,72.744 ; SW15.1@38.509,72.744 SW15.1 ; SW15.1@38.509,72.744 SW15.1 ; SW15.1 38.658,72.793 39.727,73.862 50.8,73.862 53.95,70.712 58.307,70.712 59.288,71.693 SW16.3 ; SW16.3 SW16.3@59.437,71.742 ; SW16.3 SW16.3@59.437,71.742 ; SW16.3@59.437,71.742 v1(61.116,71.742) SW16.3@59.437,71.742
NetSW16_1: SW16.1 SW17.3 | length 33.5
  Top Layer w0.254: v1(55.83,72.744) SW16.1@57.509,72.744 ; v1(55.83,72.744) SW16.1@57.509,72.744 ; v1(55.83,72.744) SW16.1@57.509,72.744 ; SW16.1@57.509,72.744 SW16.1 ; SW16.1@57.509,72.744 SW16.1 ; SW16.1@57.509,72.744 SW16.1 ; SW16.1 57.658,72.793 58.727,73.862 69.8,73.862 72.95,70.712 77.307,70.712 78.288,71.693 SW17.3 ; SW17.3 SW17.3@78.437,71.742 ; SW17.3 SW17.3@78.437,71.742 ; SW17.3 SW17.3@78.437,71.742 ; SW17.3@78.437,71.742 v1(80.116,71.742) ; SW17.3@78.437,71.742 v1(80.116,71.742) ; SW17.3@78.437,71.742 v1(80.116,71.742)
NetSW17_1: SW17.1 SW18.3 | length 33.5
  Top Layer w0.254: v1(74.83,72.744) SW17.1@76.509,72.744 ; v1(74.83,72.744) SW17.1@76.509,72.744 ; v1(74.83,72.744) SW17.1@76.509,72.744 ; SW17.1@76.509,72.744 SW17.1 ; SW17.1@76.509,72.744 SW17.1 ; SW17.1@76.509,72.744 SW17.1 ; SW17.1 76.658,72.793 77.727,73.862 88.8,73.862 91.95,70.712 96.307,70.712 97.288,71.693 SW18.3 ; SW18.3 SW18.3@97.437,71.742 ; SW18.3 SW18.3@97.437,71.742 ; SW18.3 SW18.3@97.437,71.742 ; SW18.3@97.437,71.742 v1(99.116,71.742) ; SW18.3@97.437,71.742 v1(99.116,71.742) ; SW18.3@97.437,71.742 v1(99.116,71.742)
NetSW18_1: SW18.1 SW19.3 | length 33.5
  Top Layer w0.254: v1(93.83,72.744) SW18.1@95.509,72.744 ; v1(93.83,72.744) SW18.1@95.509,72.744 ; v1(93.83,72.744) SW18.1@95.509,72.744 ; SW18.1@95.509,72.744 SW18.1 ; SW18.1@95.509,72.744 SW18.1 ; SW18.1@95.509,72.744 SW18.1 ; SW18.1 95.658,72.793 96.727,73.862 107.8,73.862 110.95,70.712 115.307,70.712 116.288,71.693 SW19.3 ; SW19.3 SW19.3@116.437,71.742 ; SW19.3 SW19.3@116.437,71.742 ; SW19.3 SW19.3@116.437,71.742 ; SW19.3@116.437,71.742 v1(118.116,71.742) ; SW19.3@116.437,71.742 v1(118.116,71.742) ; SW19.3@116.437,71.742 v1(118.116,71.742)
NetSW19_1: SW19.1 SW20.3 | length 33.5
  Top Layer w0.254: v1(112.83,72.744) SW19.1@114.509,72.744 ; v1(112.83,72.744) 114.509,72.744 SW19.1 ; v1(112.83,72.744) SW19.1@114.509,72.744 ; SW19.1@114.509,72.744 SW19.1 ; SW19.1@114.509,72.744 SW19.1 ; SW19.1 114.658,72.793 115.727,73.862 126.8,73.862 129.95,70.712 134.307,70.712 135.288,71.693 SW20.3 ; SW20.3 SW20.3@135.437,71.742 ; SW20.3 SW20.3@135.437,71.742 ; SW20.3 SW20.3@135.437,71.742 ; SW20.3@135.437,71.742 v1(137.116,71.742) ; SW20.3@135.437,71.742 v1(137.116,71.742) ; SW20.3@135.437,71.742 v1(137.116,71.742)
NetSW22_1: SW22.1 SW23.3 | length 30
  Top Layer w0.254: SW22.1@38.509,53.744 v1(36.83,53.744) SW22.1@38.509,53.744 ; SW22.1@38.509,53.744 SW22.1 ; SW22.1@38.509,53.744 SW22.1 ; SW22.1 38.658,53.793 39.727,54.862 50.8,54.862 53.95,51.712 58.307,51.712 59.288,52.693 SW23.3 ; SW23.3 SW23.3@59.437,52.742 ; SW23.3 SW23.3@59.437,52.742 ; SW23.3@59.437,52.742 v1(61.116,52.742) SW23.3@59.437,52.742
NetSW23_1: SW23.1 SW24.3 | length 33.5
  Top Layer w0.254: v1(55.83,53.744) SW23.1@57.509,53.744 ; v1(55.83,53.744) SW23.1@57.509,53.744 ; v1(55.83,53.744) SW23.1@57.509,53.744 ; SW23.1@57.509,53.744 SW23.1 ; SW23.1@57.509,53.744 SW23.1 ; SW23.1@57.509,53.744 SW23.1 ; SW23.1 57.658,53.793 58.727,54.862 69.8,54.862 72.95,51.712 77.307,51.712 78.288,52.693 SW24.3 ; SW24.3 SW24.3@78.437,52.742 ; SW24.3 SW24.3@78.437,52.742 ; SW24.3 SW24.3@78.437,52.742 ; SW24.3@78.437,52.742 v1(80.116,52.742) ; SW24.3@78.437,52.742 v1(80.116,52.742) ; SW24.3@78.437,52.742 v1(80.116,52.742)
NetSW24_1: SW24.1 SW25.3 | length 33.5
  Top Layer w0.254: v1(74.83,53.744) SW24.1@76.509,53.744 ; v1(74.83,53.744) SW24.1@76.509,53.744 ; v1(74.83,53.744) SW24.1@76.509,53.744 ; SW24.1@76.509,53.744 SW24.1 ; SW24.1@76.509,53.744 SW24.1 ; SW24.1@76.509,53.744 SW24.1 ; SW24.1 76.658,53.793 77.727,54.862 88.8,54.862 91.95,51.712 96.307,51.712 97.288,52.693 SW25.3 ; SW25.3 SW25.3@97.437,52.742 ; SW25.3 SW25.3@97.437,52.742 ; SW25.3 SW25.3@97.437,52.742 ; SW25.3@97.437,52.742 v1(99.116,52.742) ; SW25.3@97.437,52.742 v1(99.116,52.742) ; SW25.3@97.437,52.742 v1(99.116,52.742)
NetSW25_1: SW25.1 SW26.3 | length 33.5
  Top Layer w0.254: v1(93.83,53.744) SW25.1@95.509,53.744 ; v1(93.83,53.744) SW25.1@95.509,53.744 ; v1(93.83,53.744) SW25.1@95.509,53.744 ; SW25.1@95.509,53.744 SW25.1 ; SW25.1@95.509,53.744 SW25.1 ; SW25.1@95.509,53.744 SW25.1 ; SW25.1 95.658,53.793 96.727,54.862 107.8,54.862 110.95,51.712 115.307,51.712 116.288,52.693 SW26.3 ; SW26.3 SW26.3@116.437,52.742 ; SW26.3 SW26.3@116.437,52.742 ; SW26.3 SW26.3@116.437,52.742 ; SW26.3@116.437,52.742 v1(118.116,52.742) ; SW26.3@116.437,52.742 v1(118.116,52.742) ; SW26.3@116.437,52.742 v1(118.116,52.742)
NetSW26_1: SW26.1 SW27.3 | length 33.5
  Top Layer w0.254: v1(112.83,53.744) SW26.1@114.509,53.744 ; v1(112.83,53.744) 114.509,53.744 SW26.1 ; v1(112.83,53.744) SW26.1@114.509,53.744 ; SW26.1@114.509,53.744 SW26.1 ; SW26.1@114.509,53.744 SW26.1 ; SW26.1 114.658,53.793 115.727,54.862 126.8,54.862 129.95,51.712 134.307,51.712 135.288,52.693 SW27.3 ; SW27.3 SW27.3@135.437,52.742 ; SW27.3 SW27.3@135.437,52.742 ; SW27.3 SW27.3@135.437,52.742 ; SW27.3@135.437,52.742 v1(137.116,52.742) ; SW27.3@135.437,52.742 v1(137.116,52.742) ; SW27.3@135.437,52.742 v1(137.116,52.742)
NetSW29_1: SW29.1 SW30.3 | length 30
  Top Layer w0.254: SW29.1@38.509,34.744 v1(36.83,34.744) SW29.1@38.509,34.744 ; SW29.1@38.509,34.744 SW29.1 ; SW29.1@38.509,34.744 SW29.1 ; SW29.1 38.658,34.793 39.727,35.862 50.8,35.862 53.95,32.712 58.307,32.712 59.288,33.693 SW30.3 ; SW30.3 SW30.3@59.437,33.742 ; SW30.3 SW30.3@59.437,33.742 ; SW30.3@59.437,33.742 v1(61.116,33.742) SW30.3@59.437,33.742
NetSW30_1: SW30.1 SW31.3 | length 33.5
  Top Layer w0.254: v1(55.83,34.744) SW30.1@57.509,34.744 ; v1(55.83,34.744) SW30.1@57.509,34.744 ; v1(55.83,34.744) SW30.1@57.509,34.744 ; SW30.1@57.509,34.744 SW30.1 ; SW30.1@57.509,34.744 SW30.1 ; SW30.1@57.509,34.744 SW30.1 ; SW30.1 57.658,34.793 58.727,35.862 69.8,35.862 72.95,32.712 77.307,32.712 78.288,33.693 SW31.3 ; SW31.3 SW31.3@78.437,33.742 ; SW31.3 SW31.3@78.437,33.742 ; SW31.3 SW31.3@78.437,33.742 ; SW31.3@78.437,33.742 v1(80.116,33.742) ; SW31.3@78.437,33.742 v1(80.116,33.742) ; SW31.3@78.437,33.742 v1(80.116,33.742)
NetSW31_1: SW31.1 SW32.3 | length 25.7
  Top Layer w0.254: SW31.1 76.658,34.793 77.727,35.862 88.8,35.862 v1(89.339,35.323) ; SW32.3@97.288,33.693 SW32.3 97.437,33.742 v1(99.116,33.742)
  Bottom Layer w0.254: v1(89.339,35.323) 94.471,35.323 96.052,33.742 v1(99.116,33.742)
NetSW32_1: SW32.1 SW33.3 | length 26.5
  Top Layer w0.254: v1(93.83,34.726) 93.864,34.76 95.524,34.76 SW32.1 95.658,34.793 96.727,35.862 107.8,35.862 110.95,32.712 115.307,32.712 116.288,33.693 SW33.3 116.437,33.742 v1(118.116,33.742)
NetSW33_1: SW33.1 SW34.3 | length 33.5
  Top Layer w0.254: v1(112.83,34.744) SW33.1@114.509,34.744 ; v1(112.83,34.744) 114.509,34.744 SW33.1 ; v1(112.83,34.744) SW33.1@114.509,34.744 ; SW33.1@114.509,34.744 SW33.1 ; SW33.1@114.509,34.744 SW33.1 ; SW33.1 114.658,34.793 115.727,35.862 126.8,35.862 129.95,32.712 134.307,32.712 135.288,33.693 SW34.3 ; SW34.3 SW34.3@135.437,33.742 ; SW34.3 SW34.3@135.437,33.742 ; SW34.3 SW34.3@135.437,33.742 ; SW34.3@135.437,33.742 v1(137.116,33.742) ; SW34.3@135.437,33.742 v1(137.116,33.742) ; SW34.3@135.437,33.742 v1(137.116,33.742)
row1: D1.1 D2.1 D3.1 D4.1 D5.1 D6.1 D7.1 J1.8 | length 194.3
  Top Layer w0.254: v1(30,108.026) 30.886,108.026 31.801,107.112 48.086,107.112 v1(49,108.026) v1(68,108.026) v1(87,108.026) v1(106,108.026) v1(125,108.026) 125.064,107.963 139.437,107.963 140.581,106.819 146.919,106.819 148.063,107.963 154.927,107.963 v1(154.991,107.899)
  Bottom Layer w0.254: D1.1 30,107.923 27.666,105.589 27.666,96.219 27.885,96 33.05,96 34.285,94.765 34.285,87.778 33.887,87.38 32.024,87.38 J1.8 ; v1(49,108.026) D2.1 ; v1(68,108.026) D3.1 ; v1(87,108.026) D4.1 ; v1(106,108.026) D5.1 ; v1(125,108.026) D6.1 ; D7.1 152.61,120.593 156.667,116.535 156.667,114.402 154.991,112.725 v1(154.991,107.899)
row2: D8.1 D9.1 D10.1 D11.1 D12.1 D13.1 D14.1 J1.9 | length 175.1
  Top Layer w0.254: v1(30,100.2) 29.938,100.138 29.938,96.472 33.688,92.722 v1(33.688,88.025) 39.223,88.025 39.84,88.642 42.281,88.642 43.301,89.662 45.72,89.662 45.974,89.916 48.589,89.916 48.857,89.648 49.029,89.648 49.473,89.205 58.374,89.205 58.727,89.557 67.5,89.557 67.897,89.16 67.897,89.069 v1(87,89.069) v1(106,89.069) v1(125,89.069) 125.073,88.996 125.285,88.996 125.339,88.942 129.246,88.942 129.293,88.989 141.311,88.989 142.481,87.819 146.719,87.819 147.889,88.989 154.944,88.989 v1(154.991,88.942)
  Bottom Layer w0.254: D8.1 29.972,100.228 v1(30,100.2) ; J1.9 v1@33.504,87.86 ; v1(48.928,89.648) 48.924,89.653 48.924,92.267 D9.1 ; v1(68,89.069) D10.1 ; v1(87,89.069) D11.1 ; v1(106,89.069) D12.1 ; v1(125,89.069) D13.1 ; D14.1 152.61,101.636 156.667,97.578 156.667,95.445 154.991,93.768 v1(154.991,88.942)
row3: D15.1 D16.1 D17.1 D18.1 D19.1 D20.1 D21.1 J1.10 | length 182.6
  Top Layer w0.254: v1(31.496,73.364) 31.496,71.628 33.948,69.176 48.086,69.176 v1(49,70.091) v1(68,70.091) 82.791,70.091 84.986,72.286 89.258,72.286 91.453,70.091 101.791,70.091 103.986,72.286 v1(106,72.286) 108.258,72.286 110.453,70.091 v1(125,70.091) 125.064,70.027 139.873,70.027 141.081,68.819 146.819,68.819 148.027,70.027 154.927,70.027 v1(154.991,69.964)
  Bottom Layer w0.254: v1(31.496,73.364) D15.1 30,73.489 29.652,73.837 29.527,73.837 27.638,75.726 27.638,86.566 29.432,88.36 J1.10 ; v1(49,70.091) D16.1 ; v1(68,70.091) D17.1 ; v1(86.999,72.286) 86.999,73.363 D18.1 ; v1(106,72.286) D19.1 ; v1(125,70.091) D20.1@125,73.364 ; D21.1 152.61,82.657 156.667,78.6 156.667,76.466 154.991,74.79 v1(154.991,69.964)
row4: D22.1 D23.1 D24.1 D25.1 D26.1 D27.1 D28.1 J1.11 | length 211.9
  Top Layer w0.254: v1(30,51.068) 30.886,51.068 31.801,50.154 48.086,50.154 v1(49,51.068) v1(68,51.068) v1(87,51.068) v1(106,51.068) v1(125,51.068) 125.064,51.004 139.896,51.004 141.081,49.819 146.719,49.819 147.904,51.004 154.927,51.004 v1@154.991,50.941
  Bottom Layer w0.254: v1(30,51.068) D22.1 30,54.467 29.652,54.815 29.527,54.815 28.155,56.187 28.155,60.854 30.547,63.246 32.512,63.246 34.544,65.278 34.544,69.596 32.004,72.136 29.718,72.136 29.42,72.434 29.388,72.434 27.232,74.59 27.232,86.735 29.357,88.86 J1.11 ; v1(49,51.068) D23.1 ; v1(68,51.068) D24.1 ; v1(87,51.068) D25.1 ; v1(106,51.068) D26.1 ; v1(125,51.068) D27.1 ; D28.1 152.61,63.634 156.667,59.577 156.667,57.443 154.991,55.767 v1(154.991,50.941)
row5: D29.1 D30.1 D31.1 D32.1 D33.1 D34.1 D35.1 J1.12 | length 237.8
  Top Layer w0.254: v1(30,34.036) 32.004,34.036 34.905,31.135 48.086,31.135 v1(49,32.049) v1(68,32.049) v1(87,32.049) ; v1(88.392,36.83) 89.662,36.83 90.17,36.322 106.884,36.322 v1(107.392,36.83) ; v1(106,32.049) v1(125,32.049) 125.064,31.986 137.414,31.986 139.97,34.542 145.798,34.542 148.354,31.986 154.927,31.986 v1(154.991,31.922)
  Bottom Layer w0.254: v1(30,34.036) 30,35.448 27.748,37.699 27.748,61.022 30.48,63.754 32.445,63.754 34.138,65.446 34.138,69.428 31.836,71.73 29.518,71.73 26.825,74.422 26.825,86.903 29.283,89.36 J1.12 ; v1(49,32.049) D30.1@49,35.323 ; v1(68,32.049) D31.1 ; v1(87,32.049) D32.1 87,36.576 87,36.681 87.149,36.83 v1(88.392,36.83) ; v1(106,32.049) D33.1 106,36.576 106,36.681 106.149,36.83 v1(107.392,36.83) ; v1(125,32.049) D34.1 ; D35.1 152.61,44.616 156.667,40.558 156.667,38.424 154.991,36.748 v1(154.991,31.922)
pads on no net: J1.AMP1 J1.AMP2 J1.MP1 J1.MP2 MH1.0 MH2.0 MH3.0 MH4.0 MH5.0 MH6.0 MH7.0 MH8.0 MH9.0 MH10.0 MH11.0 MH12.0 MH13.0 SW1. SW2. SW3. SW4. SW5. SW6. SW7. SW8. SW9. SW10. SW11. SW12. SW13. SW14. SW15. SW16. SW17. SW18. SW19. SW20. SW21. SW22. SW23. SW24. SW25. SW26. SW27. SW28. SW29. SW30. SW31. SW32. SW33. SW34. SW35.

## Polygon pours and split planes (outlines as drawn)
GND on Top Layer "GND_L01_P000" (solid, remove dead copper, pour order 0): 24,128.016 24,26.924 166.116,26.924 166.116,128.016
+5 on Bottom Layer "+5_L02_P001" (solid, remove dead copper, pour order 1): 24,128.016 24,26.924 166.116,26.924 166.116,128.016

## Silkscreen, mask and mechanical layers (free items; w line width, h text height)
Top Overlay:
  circle w0.127: c30,30 r3
  circle w0.127: c96.502,30 r3
  circle w0.127: c163,30 r3
  circle w0.127: c163,68 r3
  circle w0.127: c163,87 r3
  circle w0.127: c163,125 r3
  circle w0.127: c30,125 r3
  circle w0.127: c96.498,125 r3
  circle w0.127: c30,68 r3
  circle w0.127: c86.995,67.996 r3
  circle w0.127: c105.994,68 r3
  circle w0.127: c141,125 r3
  circle w0.127: c141,30 r3
Bottom Overlay:
  circle w0.127: c86.995,67.996 r3
  circle w0.127: c30,125 r3
  circle w0.127: c30,68 r3
  circle w0.127: c30,30 r3
  circle w0.127: c96.502,30 r3
  circle w0.127: c105.994,68 r3
  circle w0.127: c96.498,125 r3
  circle w0.127: c141,125 r3
  circle w0.127: c141,30 r3
  circle w0.127: c163,68 r3
  circle w0.127: c163,125 r3
  circle w0.127: c163,87 r3
  circle w0.127: c163,30 r3
Mechanical 3:
  lines w0.025: 24,128 143.4,128 143.4,124.6 ccw(c143.9,124.6) 144.4,124.6 144.4,128 ; 24,128 24,128 ; 24,128 24,27 143.4,27 143.4,27.4 143.4,30.4 cw(c143.9,30.4) 144.4,30.4 144.4,27.4 144.4,27 166,27 166,128 144.4,128 ; 144.4,128 144.4,128 ; 143.4,40.2 ccw(c143.9,40.2) 144.4,40.2 144.4,42.9 144.4,44.1 ccw(c143.9,44.1) 143.4,44.1 143.4,42.9 143.4,40.2 ; 143.4,53.9 ccw(c143.9,53.9) 144.4,53.9 144.4,56.6 144.4,60.5 144.4,63.2 ccw(c143.9,63.2) 143.4,63.2 143.4,60.5 143.4,56.6 143.4,53.9 ; 143.4,72.9 ccw(c143.9,72.9) 144.4,72.9 144.4,75.6 144.4,79.4 144.4,82.1 ccw(c143.9,82.1) 143.4,82.1 143.4,79.4 143.4,75.6 143.4,72.9 ; 143.4,91.9 ccw(c143.9,91.9) 144.4,91.9 144.4,94.6 144.4,98.4 144.4,101.1 ccw(c143.9,101.1) 143.4,101.1 143.4,98.4 143.4,94.6 143.4,91.9 ; 143.4,110.877 ccw(c143.9,110.877) 144.4,110.877 144.4,113.577 144.4,114.777 144.4,117.991 ccw(c143.9,117.991) 143.4,117.991 143.4,114.777 143.4,113.577 143.4,110.877
Mechanical 4:
  drawing of 203 lines, arcs and shapes, not listed